# Altium PCB Solar_950_VDC_Standby_PS.PcbDoc (part 1 of 2)
Units mm, origin at the board's own origin, x right, y up, seen from the top; angles counter-clockwise.
Board outline 215 x 110 mm, 2 copper layers (Top Layer, Bottom Layer), stack 1.071 mm thick; 170 components, 77 nets, 404 pads, 55 vias.
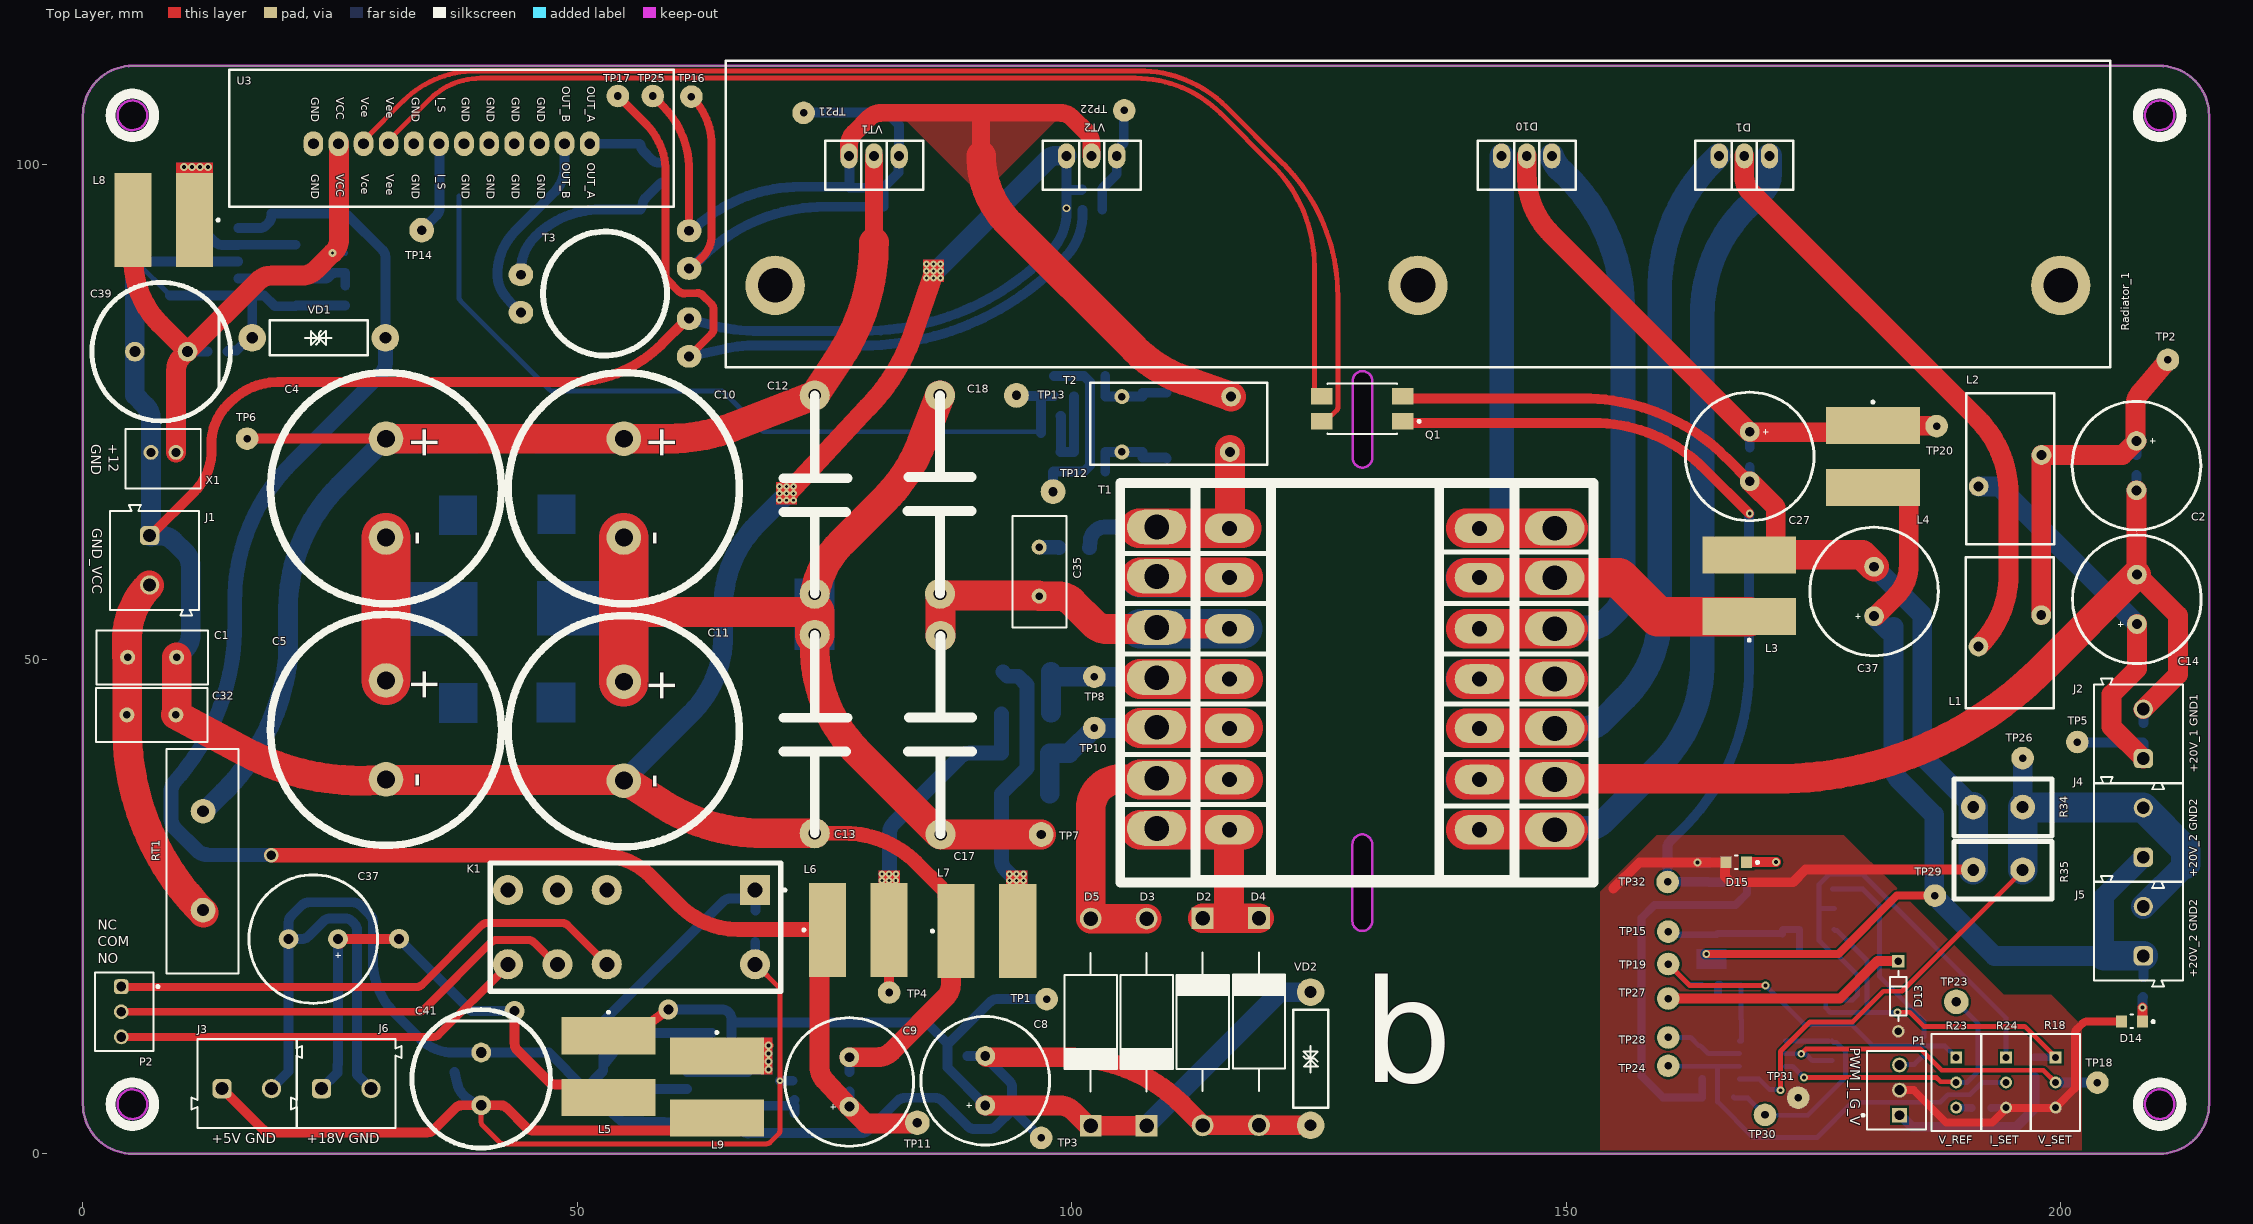
[diagram p0: Top Layer view]
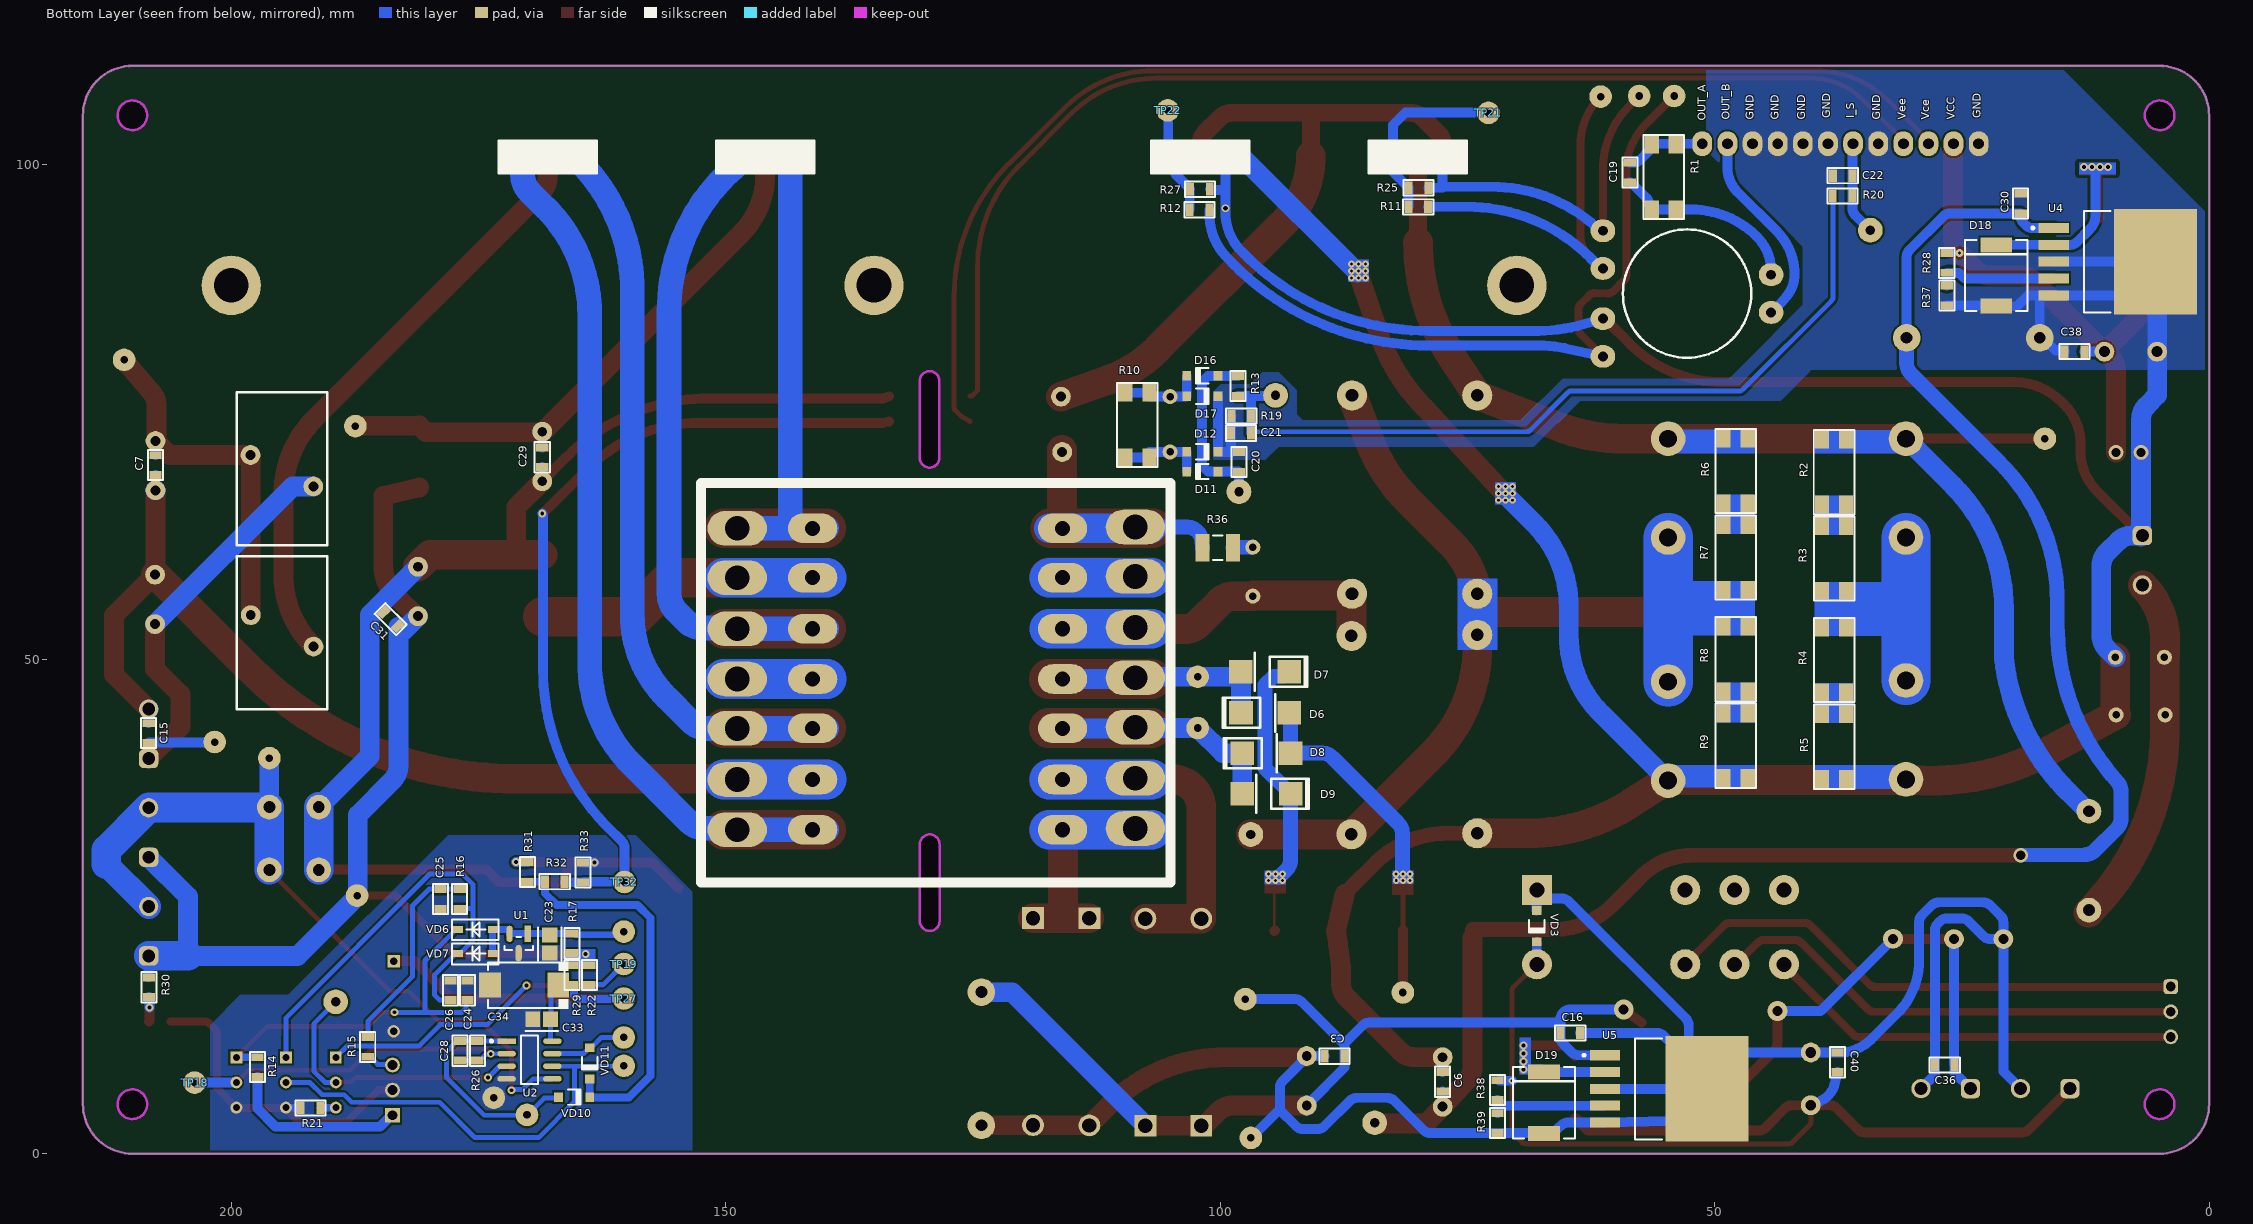
[diagram p1: Bottom Layer view, seen from below]
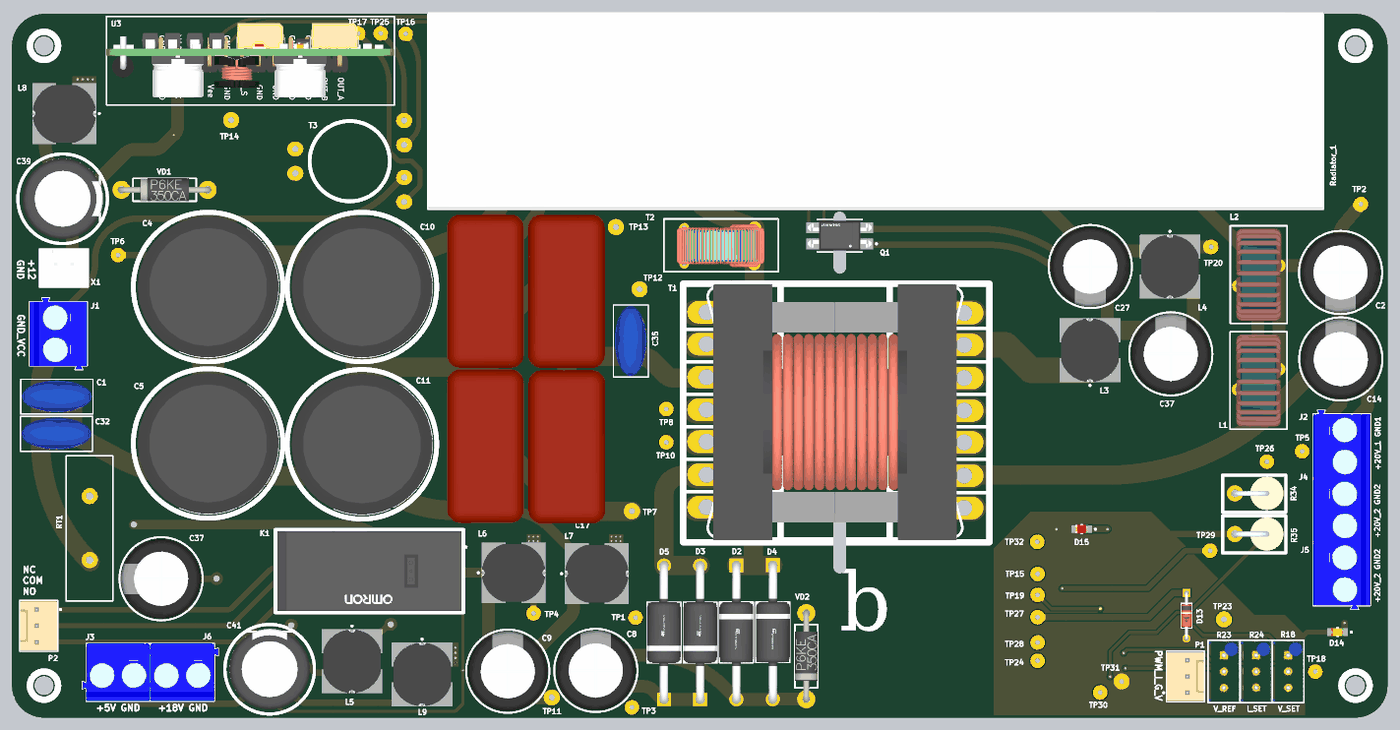
[diagram p3: 3D render of the assembled board from above, using the file's embedded part models]
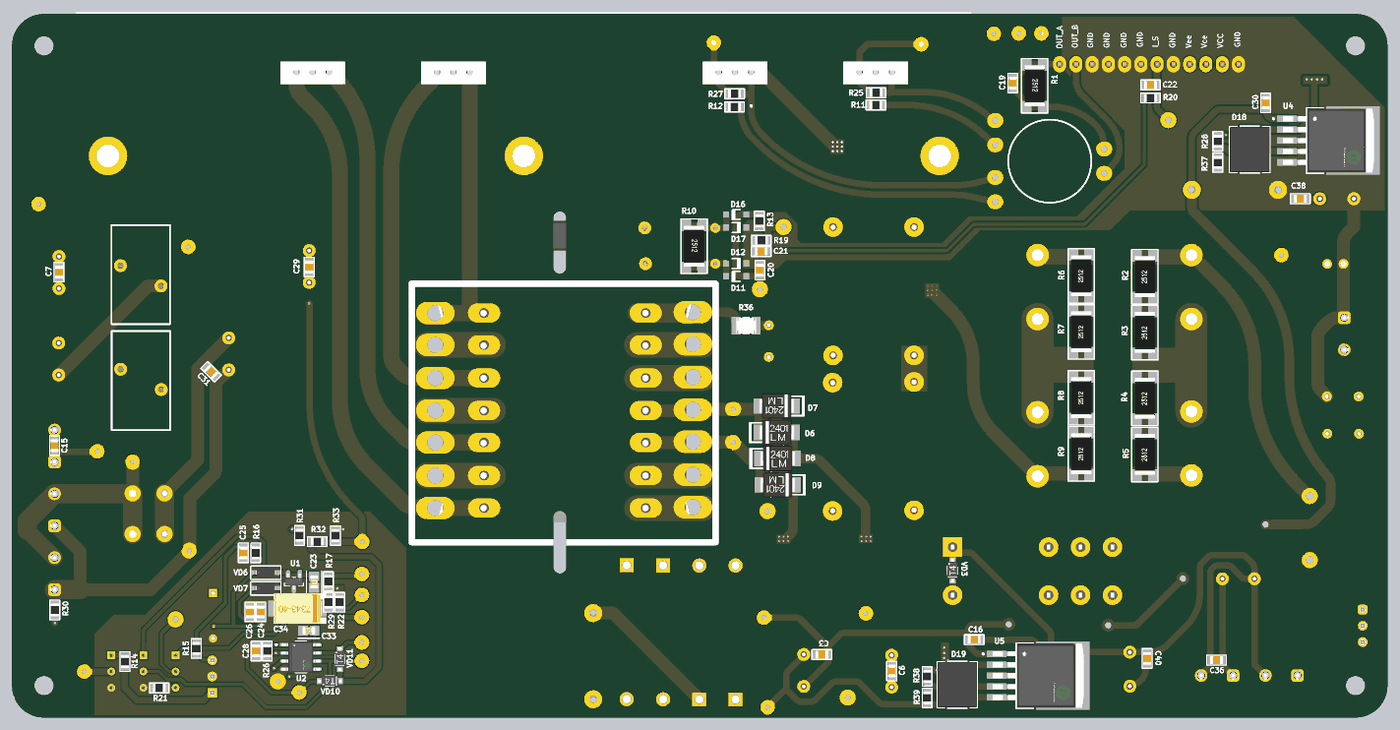
[diagram p4: 3D render of the assembled board from below, using the file's embedded part models]

## Layer stack, top to bottom
Top Solder: solder mask 0.0102, Solder Resist, Dk 3.5
Top Layer: signal copper 0.0356
Dielectric 1: dielectric 1, FR-4, Dk 4.8
Bottom Layer: signal copper 0.0356
Bottom Solder: solder mask 0.0102, Solder Resist, Dk 3.5

## Board outline
0,5 0,105 cw(c5,105) 5,110 210,110 cw(c210,105) 215,105 215,4.95 215,5 cw(c210,5) 210,0 210.025,0 5,0 cw(c5,5)
cut-out: 128.369,23.529 ccw(c129.369,23.529) 130.369,23.529 130.369,31.279 ccw(c129.369,31.279) 128.369,31.279
cut-out: 128.386,70.375 ccw(c129.386,70.375) 130.386,70.375 130.386,78.125 ccw(c129.386,78.125) 128.386,78.125
cut-out: 5,103.5 cw(c5,105) 3.5,105 cw(c5,105) 5,106.5 cw(c5,105) 6.5,105 cw(c5,105)
cut-out: 3.5,5 ccw(c5,5) 5,3.5 ccw(c5,5) 6.5,5 ccw(c5,5) 5,6.5 ccw(c5,5)
cut-out: 208.5,5 ccw(c210,5) 210,3.5 ccw(c210,5) 211.5,5 ccw(c210,5) 210,6.5 ccw(c210,5)
cut-out: 208.5,105 ccw(c210,105) 210,103.5 ccw(c210,105) 211.5,105 ccw(c210,105) 210,106.5 ccw(c210,105)

## Design rules (kind name [scope] priority, off if disabled: settings)
Clearance Clearance_1 [All vs InNet('GND_1')] p1: gap=0.2 ignorepadtopadclearanceinfootprint=FALSE
Clearance [All vs InNet('GND')] p2: gap=0.3 ignorepadtopadclearanceinfootprint=FALSE except(0.2: SMDPad-SMDPad SMDPad-THPad SMDPad-Via SMDPad-Fill SMDPad-Poly SMDPad-Region SMDPad-Text SMDPad-Hole THPad-THPad THPad-Via THPad-Fill THPad-Poly THPad-Region THPad-Text THPad-Hole Text-Text Text-Hole; 0.4: Fill-Fill Fill-Poly Fill-Region Fill-Text Fill-Hole)
ComponentClearance [All] p1: gap=-3 collisioncheckmode=3 verticalgap=0.254 showdistances=FALSE
DiffPairsRouting [All] p1: maxlimit=0.254 minlimit=0.254 mostfreqgap=0.254 substack1={A23D90DD-733B-49C5-8102-56B3D284E3A0} toplayer_{a23d90dd-733b-49c5-8102-56b3d284e3a0}_minwidth=0.381 toplayer_{a23d90dd-733b-49c5-8102-56b3d284e3a0}_maxwidth=0.381 toplayer_{a23d90dd-733b-49c5-8102-56b3d284e3a0}_prefwidth=0.381 bottomlayer_{a23d90dd-733b-49c5-8102-56b3d284e3a0}_minwidth=0.381 bottomlayer_{a23d90dd-733b-49c5-8102-56b3d284e3a0}_maxwidth=0.381 bottomlayer_{a23d90dd-733b-49c5-8102-56b3d284e3a0}_prefwidth=0.381 toplayer_minwidth=0.381 toplayer_maxwidth=0.381 toplayer_prefwidth=0.381 bottomlayer_minwidth=0.381 bottomlayer_maxwidth=0.381 bottomlayer_prefwidth=0.381 substack2={0B3DB408-A969-412D-8C07-BA8AE97219D9} toplayer_{0b3db408-a969-412d-8c07-ba8ae97219d9}_minwidth=0.381 toplayer_{0b3db408-a969-412d-8c07-ba8ae97219d9}_maxwidth=0.381 toplayer_{0b3db408-a969-412d-8c07-ba8ae97219d9}_prefwidth=0.381 bottomlayer_{0b3db408-a969-412d-8c07-ba8ae97219d9}_minwidth=0.381 bottomlayer_{0b3db408-a969-412d-8c07-ba8ae97219d9}_maxwidth=0.381 bottomlayer_{0b3db408-a969-412d-8c07-ba8ae97219d9}_prefwidth=0.381 substack3={378827E6-B38F-4565-9D2F-710D8D441C30} toplayer_{378827e6-b38f-4565-9d2f-710d8d441c30}_minwidth=0.381 toplayer_{378827e6-b38f-4565-9d2f-710d8d441c30}_maxwidth=0.381 toplayer_{378827e6-b38f-4565-9d2f-710d8d441c30}_prefwidth=0.381 bottomlayer_{378827e6-b38f-4565-9d2f-710d8d441c30}_minwidth=0.381 bottomlayer_{378827e6-b38f-4565-9d2f-710d8d441c30}_maxwidth=0.381 bottomlayer_{378827e6-b38f-4565-9d2f-710d8d441c30}_prefwidth=0.381 substack4={1E65D4A7-266F-4925-B814-5E9C4A66F8EE} toplayer_{1e65d4a7-266f-4925-b814-5e9c4a66f8ee}_minwidth=0.381 toplayer_{1e65d4a7-266f-4925-b814-5e9c4a66f8ee}_maxwidth=0.381 toplayer_{1e65d4a7-266f-4925-b814-5e9c4a66f8ee}_prefwidth=0.381 bottomlayer_{1e65d4a7-266f-4925-b814-5e9c4a66f8ee}_minwidth=0.381 bottomlayer_{1e65d4a7-266f-4925-b814-5e9c4a66f8ee}_maxwidth=0.381 bottomlayer_{1e65d4a7-266f-4925-b814-5e9c4a66f8ee}_prefwidth=0.381 substack5={93C5D03E-862D-45F8-9871-970EEA9B3F11} toplayer_{93c5d03e-862d-45f8-9871-970eea9b3f11}_minwidth=0.381 toplayer_{93c5d03e-862d-45f8-9871-970eea9b3f11}_maxwidth=0.381 toplayer_{93c5d03e-862d-45f8-9871-970eea9b3f11}_prefwidth=0.381 bottomlayer_{93c5d03e-862d-45f8-9871-970eea9b3f11}_minwidth=0.381 bottomlayer_{93c5d03e-862d-45f8-9871-970eea9b3f11}_maxwidth=0.381 bottomlayer_{93c5d03e-862d-45f8-9871-970eea9b3f11}_prefwidth=0.381 maxuncoupledlength=12.7
Height [All] p1: minheight=0 maxheight=80 prefheight=33
HoleSize [All] p1: absolutevalues=TRUE maxlimit=6 minlimit=0.01 maxpercent=80.000 minpercent=20.000
HoleToHoleClearance [All] p1: gap=0.1 allowstackedmicrovias=TRUE
MinimumSolderMaskSliver [All] p1: minsoldermaskwidth=0.1
PlaneClearance [All] p1: clearance=0.7
PlaneConnect [All] p1: planeconnectstyle=Direct reliefexpansion=0.5 reliefentries=4 reliefconductorwidth=0.5 reliefairgap=0.15
PolygonConnect VQFN20 [HasFootprint('VQFN20')] p1: connectstyle=Direct reliefconductorwidth=0.254 reliefentries=4 polygonreliefangle="90 Angle" airgapwidth=0.254
PolygonConnect [All] p2: connectstyle=Direct reliefconductorwidth=0.3 reliefentries=4 polygonreliefangle="90 Angle" airgapwidth=0.15
RoutingVias [All] p1: holewidth=0.1 width=0.1 viastyle="Through Hole" minholewidth=0 minwidth=0.3 maxholewidth=2 maxwidth=4
ShortCircuit [All] p1: allowed=TRUE
SilkToSolderMaskClearance [IsPad] p1: minsilkscreentomaskgap=0.1 clearancetoexposedcopper=TRUE
SolderMaskExpansion SolderMaskExpansion_Via [IsVia] p1: expansion=0.102 istentingtop=TRUE
SolderMaskExpansion [All] p2: expansion=0.01 istentingtop=FALSE
UnRoutedNet [All] p1: checkbadconnections=TRUE
Width [All] p1: maxlimit=5 minlimit=0.2 preferedwidth=0.3 substack1={A23D90DD-733B-49C5-8102-56B3D284E3A0} substack2={0B3DB408-A969-412D-8C07-BA8AE97219D9} substack3={378827E6-B38F-4565-9D2F-710D8D441C30} substack4={1E65D4A7-266F-4925-B814-5E9C4A66F8EE} substack5={93C5D03E-862D-45F8-9871-970EEA9B3F11}
19 further rules are at their usual default settings.

## Components (designator, comment, footprint, x,y, rotation, side; value= is the part's Value field where it differs from the comment)
C1 "" CAP-V 7,50.2 r180 top
C2 "1000uF_50V" CAPPOL-12x25 207.661,69.575 r270 top locked
C3 "1uF_50V" CAP-0805 88.425,9.85 r0 bottom
C4 "CAP-POLAR" "CAP 100uF_500V 22x40mm" 30.65,67.3 r270 top locked
C5 "CAP-POLAR" "CAP 100uF_500V 22x40mm" 30.65,42.85 r270 top
C6 "1uF_50V" CAP-0805 77.5,7.275 r90 bottom
C7 "0.1uF" CAP-0805 207.661,69.625 r90 bottom
C8 "1000uF_50V" CAPPOL-12x25 91.25,7.375 r90 top
C9 "1000uF_50V" CAPPOL-12x25 77.5,7.25 r90 top
C10 "CAP-POLAR" "CAP 100uF_500V 22x40mm" 54.7,67.3 r270 top locked
C11 "CAP-POLAR" "CAP 100uF_500V 22x40mm" 54.7,42.725 r270 top locked
C12 "CAP-NON-POLAR" CAP_3.3uF_630V 74,66.65 r90 top
C13 "CAP-NON-POLAR" CAP_3.3uF_630V 74,42.433 r90 top
C14 "2200uF_25V" CAPPOL-12x25 207.7,56.05 r90 top locked
C15 "0.1uF" CAP-0805 208.35,42.525 r270 bottom
C16 "0.1uF" CAP-0805 64.6,12.2 r0 bottom
C17 "CAP-NON-POLAR" CAP_3.3uF_630V 86.725,42.329 r270 top
C18 "CAP-NON-POLAR" CAP_3.3uF_630V 86.667,66.65 r270 top locked
C19 "1uF 50V" CAP-0805 58.575,99.2 r90 bottom
C20 "1uF 16V" CAP-0805 98.1,69.95 r270 bottom
C21 "1UF 16V" CAP-0805 97.888,72.85 r180 bottom
C22 "1UF 16V" CAP-0805 37.05,98.891 r180 bottom
C23 "50V 1uF" FP-C0805C-DN-IPC_A 167.782,21.201 r90 bottom locked value="0.22 μF"
C24 "0.1uF" CAP-0805 176.105,16.526 r270 bottom locked
C25 "0.1uF" CAP-0805 178.843,25.749 r90 bottom
C26 "0.1uF" CAP-0805 177.832,16.527 r270 bottom locked
C27 "1000uF_50V" CAPPOL-12x25 168.55,70.5 r270 top locked
C28 "0.1uF" CAP-0805 176.86,10.408 r270 bottom locked
C29 "1uF 50V" CAP-0805 168.55,70.425 r90 bottom
C30 "0.1uF" CAP-0805 19.05,96.075 r270 bottom
C31 "1uF 50V" CAP-0805 183.875,54.05 r225 bottom
C32 "" CAP-V 6.925,44.375 r180 top
C33 "50V 1uF" FP-C0805C-DN-IPC_A 168.612,13.576 r0 bottom locked value="0.22 μF"
C34 "CAP-POLAR" CAP-TAN-D 170.387,17.051 r0 bottom locked
C35 "CAP-V" CAP-V 96.7,58.85 r270 top
C36 "1uF_50V" CAP-0805 26.725,8.975 r0 bottom
C37 "2200uF_25V" CAPPOL-12x25 181.125,56.85 r90 top
C37 "1000uF_50V" CAPPOL-12x25 23.3,21.7 r180 top
C38 "0.1uF" CAP-0805 13.625,81.1 r180 bottom
C39 "2200uF_25V" CAP_POL_13x26_1000uF_50V 7.915,81.1 r0 top
C40 "0.1uF" CAP-0805 37.575,9.25 r270 bottom
C41 "2200uF_25V" CAP_POL_13x26_1000uF_50V 40.275,7.567 r90 top
D1 "U1620G" TO-220(bend1) 168,99.5 r180 top locked
D2 "SR5100" SR5100(DO-201AD 113.225,13.325 r270 top
D3 "SR5100" SR5100(DO-201AD 107.561,13.3 r90 top
D4 "SR5100" SR5100(DO-201AD 118.925,13.35 r270 top
D5 "SR5100" SR5100(DO-201AD 101.911,13.3 r90 top
D6 "US1G" DO-214AA 93.4,44.575 r0 bottom
D7 "US1G" DO-214AA 97.525,48.725 r180 bottom
D8 "US1G" DO-214AA 93.275,40.5 r0 bottom
D9 "US1G" DO-214AA 97.375,36.4 r180 bottom
D10 "U1620G" TO-220(bend1) 146,99.5 r180 top locked
D11 "1N4148W-7-F" DIOD-SOD123-2_V#1 101.8,68.975 r0 bottom
D12 "1N4148W-7-F" DIOD-SOD123-2_V#1 101.8,70.975 r180 bottom
D13 "5,6V" FP-SB-V-3906_04-031_4-MFG 183.575,15.925 r270 top
D14 "151031YS06000" LED_GREEN 207.2,13.375 r180 top
D15 "" LED_RED 167.187,29.475 r180 top
D16 "1N4148W-7-F" DIOD-SOD123-2_V#1 101.801,78.65 r0 bottom
D17 "1N4148W-7-F" DIOD-SOD123-2_V#1 101.801,76.595 r180 bottom
D18 "SS36" SMC/DO214AB 21.525,88.8 r270 bottom
D19 "SS36" SMC/DO214AB 67.25,5.15 r270 bottom
J1 "691101710002" 691101710002 7.25,60 r270 top locked
J2 "691101710002" 691101710002 207.85,42.45 r90 top locked
J3 "691101710002" 691101710002 16.575,7.075 r0 top locked
J4 "" 691101710002 207.85,32.475 r90 top locked
J5 "691101710002" 691101710002 207.85,22.5 r90 top locked
J6 "691101710002" 691101710002 26.625,7.075 r0 top locked
K1 "" Relay_F1CA005V_Omron 55.875,22.9 r180 top locked
L1 "Coil" Coil-12x7x5(vert) 194.85,52.675 r90 top
L2 "Coil" Coil-12x7x5(vert) 194.875,69.25 r270 top
L3 "1.2µH, 7.4A" WE-PD2_1054 168.5,57.425 r90 top
L4 "1.2µH, 7.4A" WE-PD2_1054 181,70.5 r270 top locked
L5 "1.2µH, 7.4A" WE-PD2_1054 53.15,8.8 r270 top
L6 "1.2µH, 7.4A" WE-PD2_1054 78.4,22.625 r0 top
L7 "1.2µH, 7.4A" WE-PD2_1054 91.406,22.5 r0 top
L8 "22µH, 2.04A" WE-PD2_1054 8.175,94.4 r180 top
L9 "22µH, 2.04A" WE-PD2_1054 64.1,6.75 r270 top locked
P1 "61900311121" 61900311121#1 183.4,6.425 r270 top
P2 "61900311121" 61900311121#2 4.175,14.35 r90 top
Q1 "PC817XNNIP0F" FP-PC817XNNIP0F-MFG 129.375,75.325 r180 top
R1 "10" RES-2512 55.15,98.75 r270 bottom
R2 "100K" RES-2512 37.926,68.925 r90 bottom
R3 "100K" RES-2512 37.925,60.2 r90 bottom
R4 "100K" RES-2512 37.925,49.925 r90 bottom
R5 "100K" RES-2512 37.925,41.15 r90 bottom
R6 "100K" RES-2512 47.881,69.05 r90 bottom
R7 "100K" RES-2512 47.875,60.3 r90 bottom
R8 "100K" RES-2512 47.881,50 r90 bottom
R9 "100K" RES-2512 47.875,41.25 r90 bottom
R10 "100" RES-2512 108.375,73.675 r270 bottom
R11 "10" RES-0805 79.975,95.75 r0 bottom
R12 "10" RES-0805 102.075,95.45 r0 bottom
R13 "1K*" RES-0805 98.2,77.625 r270 bottom
R14 "1k" RES-0805 197.35,8.75 r90 bottom
R15 "1K" RES-0805 186.2,10.8 r90 bottom
R16 "1K" RES-0805 176.912,25.749 r270 bottom
R17 "10K" RES-0805 165.551,21.276 r270 bottom locked
R18 "3296W-1-202LF" Bourns_3296W_MFG 199.487,7.2 r180 top locked
R19 "1K" RES-0805 97.863,74.6 r0 bottom
R20 "1K*" RES-0805 37.051,96.85 r180 bottom
R21 "470" RES-0805 191.992,4.635 r180 bottom
R22 "10K" RES-0805 163.787,18.051 r90 bottom locked
R23 "3296W-1-202LF" Bourns_3296W_MFG 189.432,7.2 r180 top locked
R24 "3296W-1-202LF" Bourns_3296W_MFG 194.472,7.2 r180 top locked
R25 "1K" RES-0805 79.95,97.675 r180 bottom
R26 "1K" RES-0805 175.11,10.408 r270 bottom locked
R27 "1K" RES-0805 102.05,97.525 r180 bottom
R28 "1K" RES-0805 26.525,90.075 r90 bottom
R29 "1k" RES-0805 165.551,18.051 r90 bottom locked
R30 "2.7K" RES-0805 208.314,16.825 r90 bottom
R31 "1K" RES-0805 170.061,28.474 r270 bottom
R32 "1K" RES-0805 167.287,27.5 r180 bottom
R33 "5.1K" RES-0805 164.437,28.45 r270 bottom
R34 "1.1 Ohm***" RES-2W_2 196.15,35.048 r0 top locked
R35 "1.1 Ohm***" RES-2W_2 196.15,28.698 r0 top locked
R36 "RES_1210" RES_SMD_1210_IPC_A 100.25,61.275 r180 bottom
R37 "1K*" RES-0805 26.525,86.77 r90 bottom
R38 "1K" RES-0805 71.95,6.425 r90 bottom
R39 "1K*" RES-0805 71.95,3.089 r90 bottom
Radiator_1 "Radiator_X2" Radiator_X2 135,95 r180 top locked
RT1 "NTC" NTC 12.15,29.625 r90 top locked
T1 "ETD34" Transformer_ETD34 128.641,47.744 r0 top
T2 "Current_SENS" Current_Sense_13x7x5 110.768,73.75 r0 top
T3 "TG-12x7x5" TG_12x7x5 52.791,86.975 r0 top
TP1 "" Test_Point#1 97.45,15.625 r270 top
TP2 "Test_Point_PCB" Test_Point#2 211.3,80.275 r0 top
TP3 "" Test_Point#1 96.9,1.6 r90 top
TP4 "" Test_Point#1 81.525,16.298 r90 top
TP5 "Test_Point_PCB" Test_Point#1 201.675,41.625 r0 top
TP6 "" Test_Point#1 16.6,72.3 r90 top
TP7 "" Test_Point#3 96.9,32.275 r0 top
TP8 "" Test_Point#1 102.275,48.225 r90 top
TP10 "" Test_Point#1 102.275,43.045 r90 top
TP11 "" Test_Point#3 84.375,3.125 r0 top
TP12 "Test_Point_PCB" Test_Point#3 98.1,66.95 r0 top
TP13 "Test_Point_PCB" Test_Point#3 94.4,76.674 r0 top
TP14 "Test_Point_PCB" Test_Point#3 34.25,93.385 r0 top
TP15 "" Test_Point#4 160.643,22.451 r90 top
TP16 "" Test_Point#5 61.45,106.893 r0 top
TP17 "" Test_Point#1 54.1,106.951 r90 top
TP18 "" Test_Point#1 203.705,7.187 r90 bottom
TP19 "" Test_Point#1 160.307,19.176 r90 bottom locked
TP20 "" Test_Point#1 187.45,73.575 r270 top
TP21 "" Test_Point#1 72.875,105.25 r180 bottom
TP22 "" Test_Point#1 105.3,105.5 r90 bottom
TP23 "" Test_Point#3 189.439,15.35 r0 top
TP24 "Test_Point_PCB" Test_Point#6 161.283,8.884 r90 top
TP25 "" Test_Point#7 57.628,106.893 r90 top
TP26 "Test_Point_PCB" Test_Point#1 196.15,40 r90 top
TP27 "Test_Point_PCB" Test_Point#8 160.332,15.688 r90 bottom
TP28 "Test_Point_PCB" Test_Point#9 160.383,11.749 r90 top
TP29 "" Test_Point#1 187.275,26.1 r270 top
TP30 "Test_Point_PCB" Test_Point#1 170.093,3.926 r90 top
TP31 "Test_Point_PCB" Test_Point#1 173.45,5.66 r90 top
TP32 "Test_Point_PCB" Test_Point#1 160.25,27.474 r90 bottom
U1 "" TL431_SOT-23-3(A) 170.937,21.251 r270 bottom locked
U2 "LM358DR2G" FP-751-07-IPC_C 169.837,9.476 r180 bottom locked
U3 "PWM_Controller_SG3525" PWM_SG3525 59.749,104.538 r180 top locked
U4 "" ON_Semiconductor_936A-02_MFG 9.225,90.2 r270 bottom
U5 "" ON_Semiconductor_936A-02_MFG 54.6,6.55 r270 bottom
VD1 "P6KE40" P6KE350CA 23.85,82.5 r0 top
VD2 "P6KE40" P6KE350CA 124.15,9.6 r90 top
VD3 "" DIOD-SOD123-2_V#2 68,23 r270 bottom
VD6 "DIODE" SOD-123 175.312,22.676 r180 bottom locked
VD7 "DIODE" SOD-123 175.312,20.226 r180 bottom locked
VD10 "" DIOD-SOD123-2_V#2 165.326,5.721 r180 bottom
VD11 "" DIOD-SOD123-2_V#2 163.747,9.14 r270 bottom
VT1 "MOSFET-N-GDS" TO-220(bend1) 80,99.5 r180 top locked
VT2 "MOSFET-N-GDS" TO-220(bend1) 102,99.5 r180 top locked
X1 "CONN-2-PIN" XH2- 9.415,70.914 r180 top

## Footprints (in the part's own frame and the unit in brackets; to place one, negate y for a bottom-side part, rotate by r counter-clockwise, add the part's x,y. Pads: shape width x height; smd on the part's side, far side on the other; paste and mask are expansions set on the pad)
61900311121#1 [mm] "2.54mm Male Locking Header, 3p"
  rect 1.5x1.5 hole 1: 1(2.54,0.3)
  round 1.5 hole 1: 2(0,0.3) 3(-2.54,0.3)
  silkscreen extent -3.98,-3.52 3.98,2.98, body extent -3.81,-2.9 3.81,2.9, height 11.53
61900311121#2 [mm] "2.54mm Male Locking Header, 3p"
  rrect50% 1.5x1.5 hole 1: 1(2.54,0.3)
  round 1.5 hole 1: 2(0,0.3) 3(-2.54,0.3)
  silkscreen extent -3.98,-3.52 3.98,2.98, body extent -3.81,-2.9 3.81,2.9, height 11.53
691101710002 [mm] "5,00mm - modular - blue - Horizontal entry with pressure clamp - 12,6mm height - 02p"
  rrect50% 1.95x1.95 hole 1.3: 1(-2.5,-0.5)
  round 1.95 hole 1.3: 2(2.5,-0.5)
  silkscreen extent -5.6,-4.5 5.6,4.5, body extent -5.6,-4.5 5.6,4.5, height 12.65
Bourns_3296W_MFG [mm]
  rect 1.2x1.2 hole 0.7 paste-2539.97 mask+0: 1(0.005,-2.54)
  round 1.2 hole 0.7 paste-2539.97 mask+0: 2(0.005,0) 3(0.005,2.54)
  silkscreen extent -2.48,-4.89 2.48,4.89, body extent -2.58,-4.99 2.58,4.99, height 0.25
"CAP 100uF_500V 22x40mm" [mm]
  round 3.5 hole 1.8: 1(-5,0) 2(5,0)
  silkscreen extent -11.68,-11.68 11.68,11.68, body extent -11,-11 11.1,11.1, height 31.53
CAP-0805 [mm]
  rect 0.8x1.25 smd mask+0.015: 1(-1,0) 2(1,0)
  silkscreen extent -1.52,-0.76 1.52,0.76, body extent -1,-0.62 1,0.63, height 0.8
CAP-TAN-D [mm]
  rect 2.2x2.5 smd: 1(-3.45,0) 2(3.45,0)
  silkscreen extent -4.5,-2.4 3.65,2.4, body extent -3.8,-2.3 3.8,2.3, height 4
CAP-V [mil]
  round 60 hole 30: 1(-97.44,0) 2(97.44,0)
  silkscreen extent -222,-106 221,108, body extent -216,-98 216,98, height 610
CAP_3.3uF_630V [mil]
  round 120 hole 50: 1(-395,0) 2(395,0)
  silkscreen extent -395,-130 395,125, body extent -472,-236 472,236, height 804
CAP_POL_13x26_1000uF_50V [mm]
  round 2 hole 1.1: 1(-2.667,0) 2(2.667,0)
  silkscreen extent -7,-7 7,7, body extent -6.3,-6.3 6.31,6.31, height 25.72
CAPPOL-12x25 [mm]
  round 2 hole 1: 1(-2.5,0) 2(2.5,0)
  silkscreen extent -6.5,-6.5 6.5,6.5, body extent -6.25,-6.25 6.25,6.25, height 25
Coil-12x7x5(vert) [mm] "Coil-12x7x5(vert)"
  round 2 hole 1: 1(-1.397,3.175) 2(1.778,-3.175)
  silkscreen extent -7.62,-4.45 7.62,4.45, body extent -7.2,-3.52 7.2,3.52, height 14.2
Current_Sense_13x7x5 [mm]
  round 2 hole 1: 1(5.334,2.8) 2(5.207,-2.8)
  round 1.524 hole 0.762: 3(-5.7,2.8) 4(-5.7,-2.794)
  silkscreen extent -8.89,-4.06 9.02,4.19, body extent -12.58,-3.35 12.34,3.35, height 17.72
DIOD-SOD123-2_V#1 [mm] "SOD123, 2-Leads, Body 2.7x1.55mm, Height 1.45mm"
  rect 0.9x0.95 smd: 1(-1.575,0) 2(1.575,0)
  silkscreen extent -0.64,-0.82 0.64,0.77, body extent -1.35,-0.77 1.35,0.77, height 1.45
DIOD-SOD123-2_V#2 [mm] "SOD123, 2-Leads, Body 2.7x1.55mm, Height 1.45mm"
  rect 0.9x0.95 smd: 1(1.575,0) 2(-1.575,0)
  silkscreen extent -0.64,-0.83 0.64,0.77, body extent -1.88,-0.8 1.88,0.8, height 1.3
DO-214AA [mm]
  rect 2.4x2.4 smd: 1(-0.381,0) 2(4.5,0)
  silkscreen extent 1.02,-1.91 6.35,1.91, body extent -0.75,-1.97 4.85,1.97, height 2.65
FP-751-07-IPC_C [mm]
  rect 1.874x0.543 smd paste+0 mask+0: 1(-2.316,1.905)
  rrect100% 1.874x0.543 smd paste+0 mask+0: 2(-2.316,0.635) 3(-2.316,-0.635) 4(-2.316,-1.905) 5(2.316,-1.905) 6(2.316,-0.635) 7(2.316,0.635) 8(2.316,1.905)
  silkscreen extent -3.98,-2.45 0.88,2.45, body extent -3,-2.45 3,2.45, height 1.75
FP-C0805C-DN-IPC_A [mm]
  rect 1.505x1.556 smd paste+0 mask+0: 1(-0.901,0) 2(0.901,0)
  silkscreen extent -1.65,-1.18 1.65,1.18, body extent -1,-0.63 1,0.63, height 0.88
FP-PC817XNNIP0F-MFG [mm]
  rect 2.2x1.7 smd paste+0 mask+0: 1(-4.1,1.27) 2(-4.1,-1.27) 3(4.1,-1.27) 4(4.1,1.27)
  silkscreen extent -5.88,-2.54 3.5,2.54, body extent -5.3,-2.64 5.3,2.64, height 0.25
FP-SB-V-3906_04-031_4-MFG [mm]
  rect 1.25x1.25 hole 0.75 paste-2539.97 mask+0: 1(-3.55,0)
  round 1.25 hole 0.75 paste-2539.97 mask+0: 2(3.55,0)
  silkscreen extent -2.52,-0.85 2.52,0.85, body extent -4.28,-0.95 4.28,0.95, height 0.25
LED_GREEN [mm]
  rect 1.1x1.2 smd paste+0 mask+0: 1(-1.05,0) 2(1.05,0)
  silkscreen extent -2.28,-0.67 0.13,0.67, body extent -1,-0.63 1,0.63, height 0.8
LED_RED [mm]
  rect 1.1x1.2 smd paste+0 mask+0: 1(-1.05,0) 2(1.05,0)
  silkscreen extent -2.28,-0.67 0.13,0.67, body extent -1.7,-0.77 1.7,0.77, height 0.25
NTC [mm]
  round 2.5 hole 1.2: 1(-5,0) 2(5,0)
  silkscreen extent -11.4,-3.6 11.3,3.7, body extent -11.25,-3.5 11.25,3.5, height 26.24
ON_Semiconductor_936A-02_MFG [mm]
  rect 1.016x3.05 smd paste+0 mask+0: 1(-3.404,-6.485) 2(-1.702,-6.485) 3(0,-6.485) 4(1.702,-6.485) 5(3.404,-6.485)
  rect 10.66x8.38 smd paste+0 mask+0: 6(0,3.82)
  silkscreen extent -5.12,-8.73 5.12,-0.75, body extent -5.01,-7.11 5.01,7.14, height 4.83
P6KE350CA [mm]
  round 2.8 hole 1.2: 1(-6.731,0) 2(6.731,0)
  silkscreen extent -4.95,-1.78 4.95,1.78, body extent -7.26,-1.8 7.26,1.8, height 6.9
PWM_SG3525 [mm]
  oval 2x2.524 hole 1.1: 1(8.5,2.413) 2(11.049,2.413) 3(13.589,2.413) 4(16.129,2.413) 5(18.669,2.413) 6(21.209,2.413) 7(23.749,2.413) 8(26.289,2.413) 9(28.829,2.413) 10(31.369,2.413) 11(33.909,2.413) 12(36.449,2.413)
  silkscreen extent 0,-5.08 44.96,8.76, body extent 0,-4 45,7.59, height 42
Radiator_X2 [mm]
  round 6 hole 3.5: 1(-65,7.2) 1(0,7.2) 1(65,7.2)
  silkscreen extent -70,-15.5 70,15.5, body extent -70,-15.34 70,15.35, height 69.5
Relay_F1CA005V_Omron [mil]
  rect 120x120 hole 60 paste-99999 mask+0: 1(-476.38,-147.64)
  round 120 hole 60 paste-99999 mask+0: 2(114.17,-147.64) 3(311.02,-147.64) 4(507.87,-147.64) 5(507.87,147.64) 6(311.02,147.64) 7(114.17,147.64) 8(-476.38,147.64)
  silkscreen extent -599,-255 580,255, body extent -575,-254 575,254, height 10
RES-2W_2 [mm]
  round 2.5 hole 1.2: 1(-5,0) 2(0,0)
  silkscreen extent -6.93,-2.95 2.95,2.85, body extent -5.4,-2.6 2.6,2.6, height 21.6
RES-0805 [mm]
  rect 0.8x1.25 smd mask+0.015: 1(-1,0) 2(1,0)
  silkscreen extent -1.52,-0.76 1.52,0.76, body extent -1,-0.62 1,0.63, height 0.6
RES-2512 [mm]
  rect 1.8x1.45 smd: 1(-3.275,-1.225) 1(-3.275,1.225) 2(3.275,-1.225) 2(3.275,1.225)
  silkscreen extent -4.28,-2.05 4.25,2.05, body extent -3.2,-1.6 3.2,1.6, height 0.6
RES_SMD_1210_IPC_A [mm]
  rect 1.405x2.806 smd paste+0 mask+0: 1(-1.551,0) 2(1.551,0)
  silkscreen extent -0.47,-1.25 0.47,1.25, body extent -1.6,-1.25 1.6,1.25, height 0.6
SMC/DO214AB [mm]
  rect 1.52x3.2 smd: 1(-3.105,0) 2(3.105,0)
  silkscreen extent -3.6,-3.15 3.6,3.15, body extent -3.77,-3.11 3.77,3.11, height 2.62
SOD-123 [mm]
  rect 1x0.7 smd: 1(-1.75,0) 2(1.75,0)
  silkscreen extent -2.37,-1.08 2.35,1.02, body extent -1.98,-0.85 1.98,0.85, height 1.45
SR5100(DO-201AD [mm]
  rect 2.2x2.2 hole 1.45 paste-2539.97 mask+0: 1(-10.47,0)
  round 2.2 hole 1.45 paste-2539.97 mask+0: 2(10.47,0)
  silkscreen extent -7,-2.67 7,2.67, body extent -11.67,-2.75 11.67,2.75, height 0.25
Test_Point#1 [mil]
  round 90 hole 30 paste-99999 mask+4: 1(0,0)
Test_Point#2 [mil]
  round 90 hole 30 paste-99999 mask+4: 1(-18.15,0)
Test_Point#3 [mil]
  round 98.43 hole 37.4: 1(0,0)
Test_Point#4 [mil]
  round 90 hole 30 paste-99999 mask+4: 1(0,13.23)
Test_Point#5 [mil]
  round 90 hole 30 paste-99999 mask+4: 1(2.95,0)
Test_Point#6 [mil]
  round 90 hole 30 paste-99999 mask+4: 1(0,38.41)
Test_Point#7 [mil]
  round 90 hole 30 paste-99999 mask+4: 1(2.29,0)
Test_Point#8 [mil]
  round 90 hole 30 paste-99999 mask+4: 1(0,-0.99)
Test_Point#9 [mil]
  round 90 hole 30 paste-99999 mask+4: 1(0,2.96)
TG_12x7x5 [mm]
  oval 2.5x2.3 hole 1: 1(-8.509,1.905) 2(-8.509,-1.905) 3(8.509,6.35) 4(8.509,2.54) 5(8.509,-6.35) 6(8.509,-2.54)
  silkscreen extent -6.27,-6.27 6.27,6.27, body extent -8.85,-6.7 8.85,6.7, height 9.48
TL431_SOT-23-3(A) [mm]
  rect 1.659x0.627 smd paste+0 mask+0: 1(-0.977,0.915)
  rrect100% 1.659x0.627 smd paste+0 mask+0: 2(-0.977,-0.915) 3(0.977,0)
  silkscreen extent -0.65,-1.45 0.65,1.45, body extent -1.2,-1.45 1.2,1.45, height 1.1
TO-220(bend1) [mm]
  oval 1.75x2.54 hole 1: 1(-2.54,-1.4) 2(0,-1.4) 3(2.54,-1.4)
  silkscreen extent -4.95,-2.92 4.95,2.03, body extent -4.98,-2.19 4.98,2.69, height 22.68
Transformer_ETD34 [mm]
  oval 6x3.5 hole 2.5: 1(-20.066,15.621) 2(-20.066,10.627) 3(-20.066,5.461) 4(-20.066,0.381) 5(-20.066,-4.613) 6(-20.066,-9.779) 7(-20.066,-14.859) 8(20.193,-14.986) 9(20.193,-9.906) 10(20.193,-4.74) 11(20.193,0.254) 12(20.193,5.334) 13(20.193,10.5) 14(20.193,15.494)
  oval 5x3 hole 1.524: 1(-12.7,15.494) 2(-12.7,10.5) 3(-12.7,5.334) 4(-12.7,0.254) 5(-12.7,-4.74) 6(-12.7,-9.906) 7(-12.7,-14.986) 8(12.573,-14.986) 9(12.573,-9.906) 10(12.573,-4.74) 11(12.573,0.254) 12(12.573,5.334) 13(12.573,10.5) 14(12.573,15.494)
  Top Layer lines w2: -21.717,5.334 -20.066,5.334 -12.7,5.334 -11.32,5.334
  Top Layer lines w4: -21.844,15.494 -21.443,15.494 -20.066,15.494 -12.7,15.494 -11.447,15.494 ; -21.717,-14.986 -21.443,-14.986 -20.066,-14.986 -12.741,-14.986 -12.7,-14.986 -11.32,-14.986 ; -21.717,-9.906 -20.066,-9.906 -12.7,-9.906 -11.32,-9.906 ; -21.717,-4.699 -20.066,-4.699 -12.7,-4.699 -11.32,-4.699 ; -21.717,0.254 -20.066,0.254 -12.7,0.254 -11.32,0.254 ; -21.717,10.541 -11.32,10.541 ; 11.176,-14.986 12.573,-14.986 20.193,-14.986 21.573,-14.986 ; 11.176,-9.906 12.573,-9.906 20.193,-9.906 21.573,-9.906 ; 11.176,-4.74 12.573,-4.74 20.193,-4.74 20.409,-4.74 21.573,-4.74 ; 11.176,0.254 19.312,0.254 21.573,0.254 ; 11.176,5.334 12.573,5.334 20.193,5.334 21.573,5.334 ; 11.176,10.5 12.573,10.5 20.193,10.5 21.573,10.5 ; 11.176,15.494 12.573,15.494 20.193,15.494 21.037,15.494 21.573,15.494
  Bottom Layer lines w2: -21.734,-4.74 -20.066,-4.74 -12.7,-4.74 -11.337,-4.74 ; -21.734,0.254 -20.066,0.254 -12.7,0.254 -11.337,0.254
  Bottom Layer lines w2.5: 11.159,-14.986 12.573,-14.986 20.193,-14.986 21.556,-14.986 ; 11.159,-4.74 12.573,-4.74 20.193,-4.74 21.556,-4.74 ; 11.159,5.334 12.573,5.334 20.193,5.334 21.556,5.334 ; 11.159,15.494 12.573,15.494 20.193,15.494 21.556,15.494
  Bottom Layer lines w3: -21.734,15.494 -20.193,15.494 -20.066,15.494 -12.7,15.494 -11.337,15.494
  Bottom Layer lines w4: -21.734,-14.986 -20.066,-14.986 -12.7,-14.986 -11.337,-14.986 ; -21.734,-9.906 -21.443,-9.906 -20.767,-9.906 -20.193,-9.906 -20.066,-9.906 -12.7,-9.906 -11.337,-9.906 ; -21.734,5.334 -20.066,5.334 -12.7,5.334 -11.337,5.334 ; -21.734,10.5 -11.337,10.5 ; 11.159,-9.906 12.573,-9.906 20.193,-9.906 21.556,-9.906 ; 11.159,0.254 21.556,0.254 ; 11.159,10.5 12.573,10.5 20.193,10.5 21.443,10.5 21.556,10.5
  silkscreen extent -23.75,-20.32 24.13,20.07, body extent -20.11,-20 20.11,20, height 34.58
WE-PD2_1054 [mm] "SMD Power Inductor, 2-Leads, body 10x9mm"
  rect 3.75x9.5 smd: 1(-3.125,0) 2(3.125,0)
  silkscreen extent -5.62,-0.13 -5.38,0.12, body extent -5.04,-4.5 5.04,4.5, height 5.43
XH2- [mm]
  round 1.5 hole 0.9: 1(0,0) 2(2.54,0)
  silkscreen extent -2.5,-2.35 5.13,3.65, body extent -2.4,-2.25 5,3.55, height 7

## Part data
C1 C32: library part CAP-V
C2 C14 C27 C37: library part CAP-POLAR
C3 C6 C7 C15 C16 C19 C20 C21 C22 C24 C25 C26 C28 C29 C30 C31 C36 C38 C40: library part CAP-NON-POLAR
C8 C9 C37: library part CAP-POLAR, "1000uF_50V  12x25(13x26mm)"
C23 C33: library part CMP-1036-04552-2, "CAP CER 0.22UF 50V X7R 0805", Capacitance="0.22 μF", Manufacturer=KEMET, Manufacturer Part Number=C0805C224K5RACTU, Package=C0805C-DN, Temperature="-55°C to +125°C", Temperature Characteristic=X7R, Temperature Coefficient=30ppm/°C, Temperature Range High=+125°C, Temperature Range Low=-55°C, Tolerance=0.1, Voltage Rating="50 V", Automotive=No, Category=Cap, ComponentLink2Description=Datasheet, ComponentLink2URL=https://content.kemet.com/datasheets/KEM_C1003_C0G_SMD.pdf, Device Class L1="Passive Components", Device Class L2=Capacitors, Device Class L3="Ceramic Capacitors", Digikey Description="CAP CER 0.22UF 50V X7R 0805", Height=0.88mm, Ipc Land Pattern Name=CAPC200125X78, Lead Free=Yes, Material=Ceramic, Mouser Description="CAP CER 0.22UF 50V X7R 0805", Octopart=https://octopart.com/c0805c224k5ractu-kemet-144670, RoHS=TRUE
C39 C41: library part CAP_polar_Hitano
D11 D12 D16 D17 VD3 VD10 VD11: library part 1N4148, "Fast Switching Diode, 100 V, 0.15 A, -65 to 150 degC, 2-Pin?SOD123, RoHS, Tape and Reel", If - Forward Current=0.15A, Ir - Reverse Current=1uA, Manufacturer=DiodesIncorporated, Max Surge Current=2A, Maximum Operating Temperature=+150C, Minimum Operating Temperature=-65C, Operating Temperature Range=-65Cto+150C, Package / Case=SOD-123, Package Reference=SOD123-2, Peak Reverse Voltage=100V, Vf - Forward Voltage=1.25V, Brand=DiodesIncorporated, Configuration=Single, Datasheet URL=http://www.farnell.com/datasheets/1915529.pdf, Datasheet Version="Rev. 24-2, 10/2013", Factory Pack Quantity=3000, Height=1.25mm, Length=2.85mm, Manufacturer URL=http://www.diodes.com/, Mounting Style=SMD/SMT, Package URL=http://www.diodes.com/datasheets/ds18004.pdf, Packaging=Reel, Product=SwitchingDiodes, Product Category=Diodes-GeneralPurpose,Power,Switching, Recovery Time=4ns, RoHS=True, Series=1N4148, Type=SwitchingDiode, Unit Weight=0.000353oz, Width=1.7mm
D13: library part CMP-02541-000026-1, "DIODE ZENER 8.2V 500MW DO35", Case/Package=DO-35, Max Operating Temperature=175°C, Max Power Dissipation=500mW, Max Reverse Leakage Current=100nA, Min Operating Temperature=-65°C, Package Quantity=30000, Test Current=5mA, Tolerance=2%, Zener Voltage=8.2V, Contact Plating=Tin, Element Configuration=Single, ESD Protection=No, Impedance=7R, Lead Free="Lead Free", Mount="Through Hole", Number of Pins=2, Packaging="Ammo Pack", Power Dissipation=500mW, Radiation Hardening=No, RoHS Compliant=Yes, Series="Automotive, AEC-Q101", Voltage Tolerance=2%
D14: library part LED, "WURTH ELEKTRONIK - 151031YS06000 - LED, Yellow, Through Hole, T-1 (3mm), 30 mA, 2 V, 590 nm", Manufacturer_Name="Wurth Elektronik", Mouser Part Number=710-151031YS06000, Datasheet Link=https://katalog.we-online.de/led/datasheet/151031YS06000.pdf, Geometry.Height=5.5mm, Manufacturer_Part_Number=151031YS06000, Mouser Price/Stock=https://www.mouser.co.uk/ProductDetail/Wurth-Elektronik/151031YS06000?qs=LlUlMxKIyB3xSYYW%252BcuBiQ%3D%3D
D15: library part LED, "WURTH ELEKTRONIK - 151031YS06000 - LED, Yellow, Through Hole, T-1 (3mm), 30 mA, 2 V, 590 nm", Manufacturer_Name="Wurth Elektronik", Manufacturer_Part_Number=151031YS06000, Mouser Part Number=710-151031YS06000, Datasheet Link=https://katalog.we-online.de/led/datasheet/151031YS06000.pdf, Geometry.Height=5.5mm, Mouser Price/Stock=https://www.mouser.co.uk/ProductDetail/Wurth-Elektronik/151031YS06000?qs=LlUlMxKIyB3xSYYW%252BcuBiQ%3D%3D
D18 D19: library part SS36_Schottky
J1 J2 J3 J5 J6: "WR-TBL Series 101 Horizontal Entry Modular, THT, pitch 5mm, 2p", Manufacturer="Wurth Elektronik", Operating Temperature Max=105°C, Operating Temperature Min=-40°C, Rated Current=16A, Working Voltage=250V, Application="Pressure Clamp", Category="Terminal Blocks", ComponentLink1Description="Website Link", ComponentLink1URL=https://www.we-online.com/redexpert/article/691101710002?ad, ComponentLink2Description="Datasheet Link", ComponentLink2URL=https://www.we-online.com/redexpert/spec/691101710002?ad, Manufacturer Part Number=691101710002, Match Code=WR-TBL, Modularity=Yes, Mount="Through Hole", Number of Pins=2, Number of Rows=1, Orientation=Horizontal, Packaging=Box, Pitch=5mm
J4: library part 691101710002, "WR-TBL Series 101 Horizontal Entry Modular, THT, pitch 5mm, 2p", Manufacturer="Wurth Elektronik", Operating Temperature Max=105°C, Operating Temperature Min=-40°C, Rated Current=16A, Working Voltage=250V, Application="Pressure Clamp", Category="Terminal Blocks", ComponentLink1Description="Website Link", ComponentLink1URL=https://www.we-online.com/redexpert/article/691101710002?ad, ComponentLink2Description="Datasheet Link", ComponentLink2URL=https://www.we-online.com/redexpert/spec/691101710002?ad, Manufacturer Part Number=691101710002, Match Code=WR-TBL, Modularity=Yes, Mount="Through Hole", Number of Pins=2, Number of Rows=1, Orientation=Horizontal, Packaging=Box, Pitch=5mm
K1: library part F1CA005V, "F1CA005V"
L3 L4 L5 L6 L7: library part 744776012, "WE-PD2 SMT Power Inductor, size 1054, 1.2µH, 7.4A, 0.006Ω", Case/Size Code=1054, DC Resistance=0.004Ω, DC Resistance Max=0.006Ω, Inductance=1.2µH, Manufacturer="Wurth Elektronik", Operating Temperature Max=125°C, Operating Temperature Min=-40°C, Rated Current=7.4A, Saturation Current=11A, Self Resonant Frequency=110MHz, Category="Unshielded Power Inductors", ComponentLink1Description="Website Link", ComponentLink1URL=https://www.we-online.com/redexpert/article/744776012?ad, ComponentLink2Description="Datasheet Link", ComponentLink2URL=https://www.we-online.com/redexpert/spec/744776012?ad, Height=5.4mm, Length=10mm, Manufacturer Part Number=744776012, Match Code=WE-PD2, Mount="Surface Mount", Packaging="Tape and Reel", Width=9mm, Simulation ModelName=1054_744776012_1.2u, Simulation ModelText=".subckt 1054_744776012_1.2u 1 2 / Rp 1 2 3008.47196972 / Cp 1 2 1.94370161067p / Rs 1 N3 0.006 / L1 N3 2 1.2u / .ends 1054_744776012_1.2u", Simulation PortMap=(1:1),(2:2)
L8 L9: library part 744776122, "WE-PD2 SMT Power Inductor, size 1054, 22µH, 2.04A, 0.1Ω", Case/Size Code=1054, DC Resistance=0.051Ω, DC Resistance Max=0.1Ω, Inductance=22µH, Manufacturer="Wurth Elektronik", Operating Temperature Max=125°C, Operating Temperature Min=-40°C, Rated Current=2.04A, Saturation Current=2.07A, Self Resonant Frequency=16MHz, Category="Unshielded Power Inductors", ComponentLink1Description="Website Link", ComponentLink1URL=https://www.we-online.com/redexpert/article/744776122?ad, ComponentLink2Description="Datasheet Link", ComponentLink2URL=https://www.we-online.com/redexpert/spec/744776122?ad, Height=5.4mm, Length=10mm, Manufacturer Part Number=744776122, Match Code=WE-PD2, Mount="Surface Mount", Packaging="Tape and Reel", Width=9mm
  L8: Simulation ModelName=1054_744776122_22u, Simulation ModelText=".subckt 1054_744776122_22u 1 2 / Rp 1 2 22000 / Cp 1 2 4.3p / Rs 1 N3 0.0511 / L1 N3 2 22u / .ends 1054_744776122_22u", Simulation PortMap=(1:1),(2:2)
P1 P2: "WR-WTB THT Male Vertical Locking Header, pitch 2.54mm, 3pins", Contact Resistance=20mΩ, Manufacturer="Wurth Elektronik", Operating Temperature Max=105°C, Operating Temperature Min=-40°C, Rated Current=3A, Withstanding Voltage=1000VAC, Working Voltage=250VAC, Category="Wire-to-Board Connectors", ComponentLink1Description="Website Link", ComponentLink1URL=https://www.we-online.com/redexpert/article/61900311121?ad, ComponentLink2Description="Datasheet Link", ComponentLink2URL=https://www.we-online.com/redexpert/spec/61900311121?ad, Gender=Male, Height=11.5mm, Length=7.62mm, Manufacturer Part Number=61900311121, Match Code=WR-WTB, Mount="Through Hole", Number of Pins=3, Number of Rows=1, Orientation=Vertical, Packaging=Bag, Pitch=2.54mm, Width=5.8mm
Q1: library part CMP-65434-000005-1, "OPTOISOLATOR 5KV TRANS 4SMD", Case/Package=SMD/SMT, Collector Emitter Saturation Voltage=200mV, Collector Emitter Voltage (VCEO)=80V, Forward Current=50mA, Forward Voltage=1.4V, Isolation Voltage=5kV, Max Operating Temperature=100°C, Max Power Dissipation=200mW, Min Operating Temperature=-30°C, Output Current per Channel=30mA, Package Quantity=2000, Reverse Breakdown Voltage=6V, Collector-emitter Voltage-Max=200mV, Contact Plating=Copper, Fall Time=18000ns, Input Current=50mA, Input Type=DC, Isolation Voltage-Max=5kV, Lead Free="Lead Free", Max Collector Current=50mA, Max Input Current=50mA, Max Output Voltage=80V, Mount="Surface Mount", Number of Channels=1, Number of Elements=1, Number of Pins=4, Output Voltage=80V, Packaging="Tape and Reel", Power Dissipation=200mW, Radiation Hardening=No, Rise Time=18000ns, RoHS Compliant=Yes
R1 R11 R12 R14 R29 R37 R39: library part RES-CONST, "1K"
R2 R3 R4 R5 R6 R7 R8 R9: library part RES-CONST, "500K"
R10 R13 R15 R16 R17 R19 R20 R21 R25 R26 R27 R28 R30 R31 R32 R33 R38: library part RES-CONST
R22: library part RES-CONST, "1-K"
R34 R35: library part RES-CONST, "10K"
TP1 TP2 TP3 TP4 TP5 TP6 TP7 TP8 TP10 TP11 TP12 TP13 TP14 TP15 TP16 TP17 TP18 TP19 TP20 TP21 TP22 TP23 TP24 TP25 TP26 TP27 TP28 TP29 TP30 TP31 TP32: library part TP_PCB?, "Test_Point"
U1: library part TL431_SOT-23-3, "TL431_SOT-23-3"
U2: library part CMP-1310-00291-2, "IC OPAMP GP 2 CIRCUIT 8SOIC", Case/Package=SOIC, Dual Supply Voltage=9V, Input Bias Current=250nA, Input Offset Voltage (Vos)=7mV, Max Dual Supply Voltage=16V, Max Operating Temperature=70°C, Max Supply Voltage=32V, Min Dual Supply Voltage=1.5V, Min Operating Temperature=0°C, Min Supply Voltage=3V, Nominal Supply Current=1.2mA, Operating Supply Current=1.5mA, Output Current=40mA, Package Quantity=2500, Power Supply Rejection Ratio (PSRR)=65dB, Voltage Gain=100dB, Bandwidth=1MHz, Common Mode Rejection Ratio=65dB, Contact Plating=Tin, Gain Bandwidth Product=1MHz, Halogen Free="Halogen Free", Height=1.5mm, Lead Free="Lead Free", Length=5mm, Number of Amplifiers=2, Number of Channels=2, Number of Circuits=2, Number of Elements=2, Number of Pins=8, Operating Supply Voltage=16V, Output Current per Channel=40mA, Packaging="Tape and Reel", Radiation Hardening=No, REACH SVHC="No SVHC", Slew Rate=0.6V/µs, Width=4mm
U4 U5: library part LM2576D2T-005G
VD1 VD2: library part Suppressor

## Via types
v1: diameter 0.7, hole 0.3, Top Layer to Bottom Layer, tented both sides, 31 vias
v2: diameter 0.8, hole 0.4, Top Layer to Bottom Layer, tented both sides, 18 vias
v3: diameter 2, hole 1, Top Layer to Bottom Layer, tented both sides, 3 vias
v4: diameter 1.5, hole 1, Top Layer to Bottom Layer, tented both sides, 1 vias
v5: diameter 0.8, hole 0.3, Top Layer to Bottom Layer, tented both sides, 1 vias
v6: diameter 0.8, hole 0.5, Top Layer to Bottom Layer, tented both sides, 1 vias

## Nets (pads, with @x,y where several pads share a name; then routed paths per layer and width w, separated by ;. In a path a pad name is that pad's centre, name@x,y a point inside that pad or via, vN(x,y) a via of type N, cw(c..) or ccw(c..) an arc to the next point about the centre after c; other vN are vias at no path point)
+20V: C31.2 C37.1@181.125,54.35 J4.1 J5.1 L4.2 R17.2 R22.2 R29.2 R30.2 TP29.1 | length 111
  Top Layer w0.8: v2(164.157,20.201) 177.517,20.201 183.416,26.1 TP29.1@187.275,26.1
  Top Layer w2: L4.2@181,67.375 184.625,66.5 184.625,59.456 cw(c180.385,59.456) 183.383,56.458 C37.1@181.275,54.35
  Bottom Layer w1: R30.2@208.35,17.861 J5.1@208.35,20
  Bottom Layer w2: C37.1@181.125,54.35 182.65,52.825 ; C31.2@183.1,53.275 183.1,39.178 ccw(c185.1,39.178) 183.684,37.766 183.686,37.764 187.2,34.25 187.2,26.1 193.3,20 204.375,20 204.375,26 J4.1@208.35,29.975
  Bottom Layer w3: 204.375,20 J5.1@208.35,20
+950V: C4.1 C10.1 C12.2 R2.2 R6.2 RT1.2 TP6.1 VT1.2 | length 128
  Top Layer w1: TP6.1@16.6,72.3 C4.1@30.65,72.3 ; 58.825,72.3 59.125,72.6
  Top Layer w1.8: 80,92.167 80,92.17 VT1.2@80,100.9
  Top Layer w3: C4.1@30.65,72.3 C10.1@54.7,72.3 58.825,72.3 59.294,72.3 59.298,72.3 ccw(c59.298,90.203) 65.736,73.498 73.988,76.678 C12.2@74,76.683 76.507,80.496 ccw(c58.757,92.167) 80,92.167
  Bottom Layer w2: RT1.2@12.126,34.468 12.128,34.484 ccw(c11.325,35.506) 12.244,34.586 14.225,36.567 ccw(c-1.842,52.641) 20.734,50.03 ccw(c18.747,50.258) 20.747,50.257 20.75,55.217 cw(c22.75,55.216) 20.75,55.226 20.75,55.229 cw(c38.343,55.113) 25.904,67.554 C4.1@30.65,72.3